# Altium PCB bspd.PcbDoc
Units mm, origin at the board's own origin, x right, y up, seen from the top; angles counter-clockwise.
Board outline 90 x 70 mm, 2 copper layers (F.Cu, B.Cu); 75 components, 35 nets, 192 pads, 148 vias.
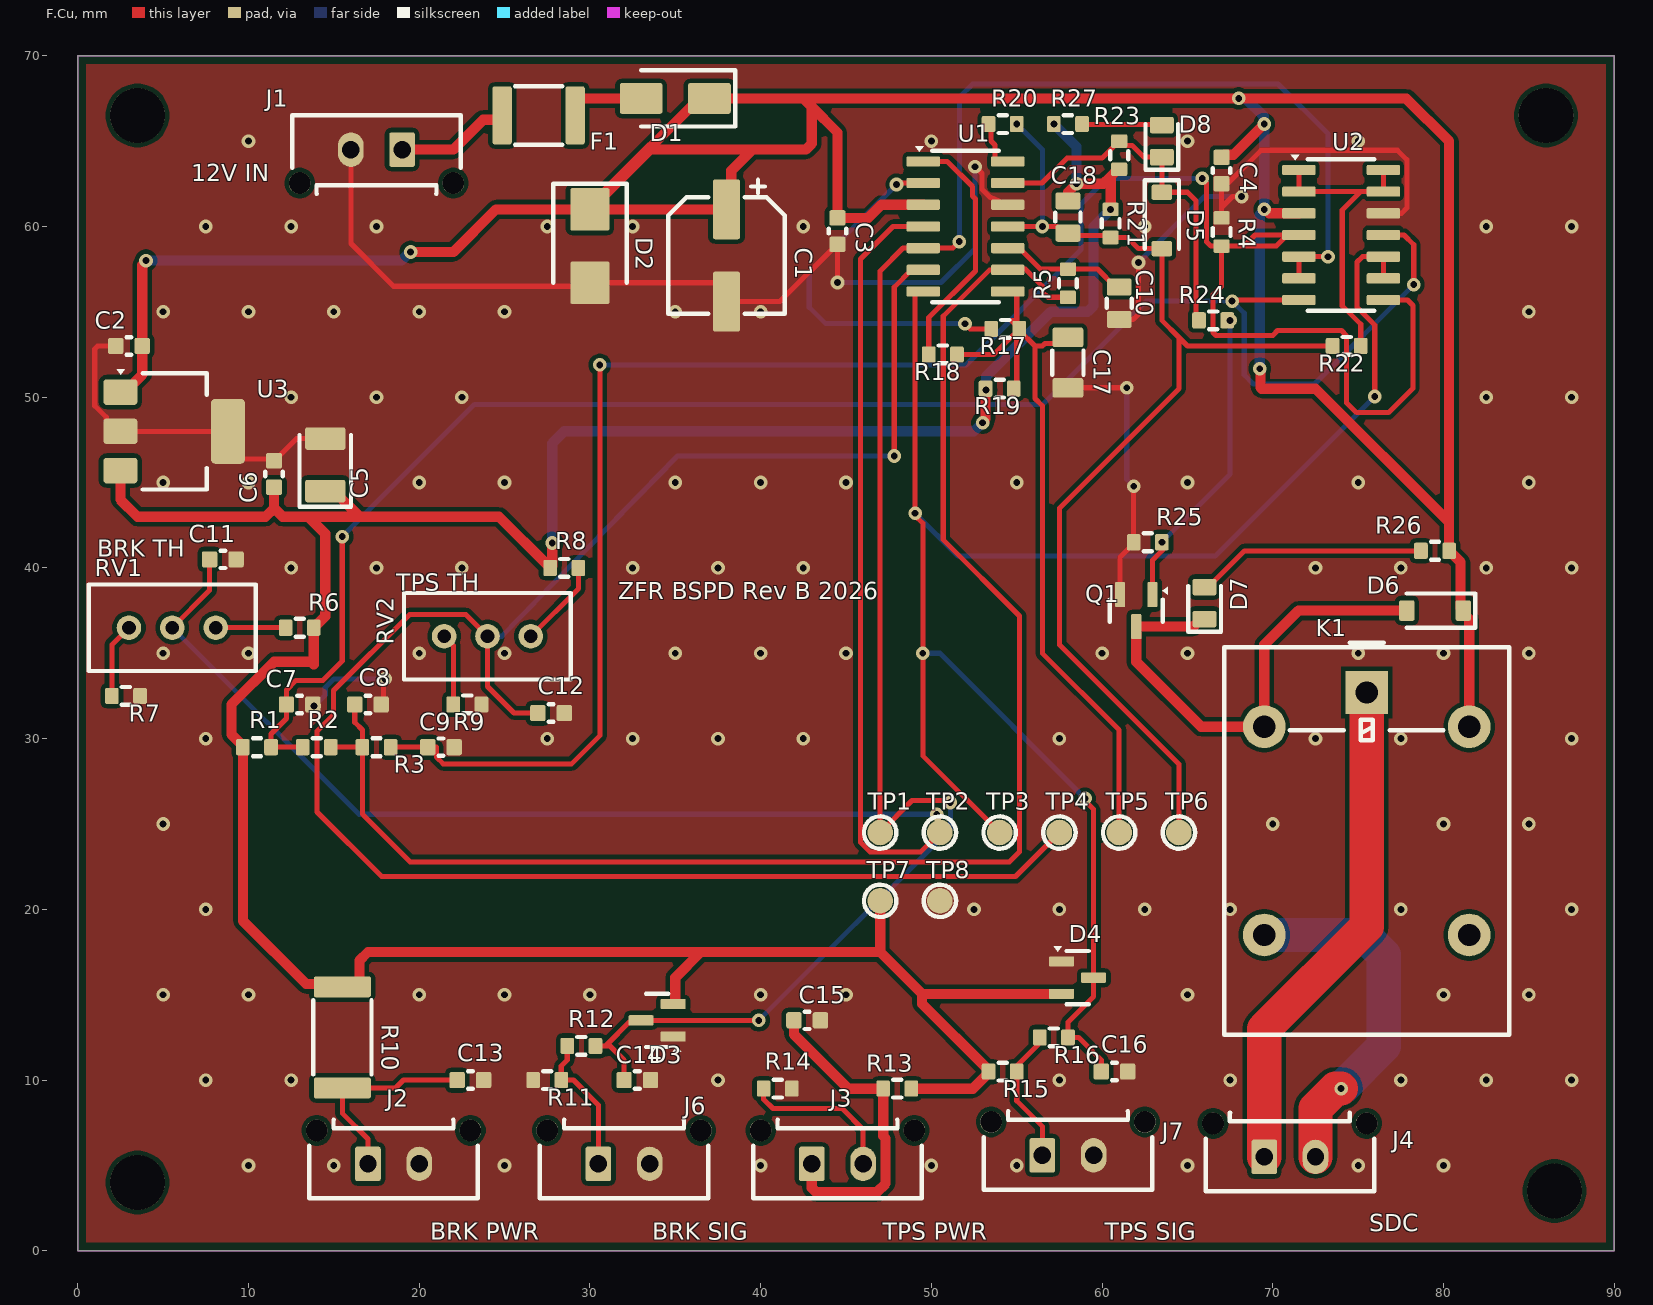
[diagram p0: F.Cu view]
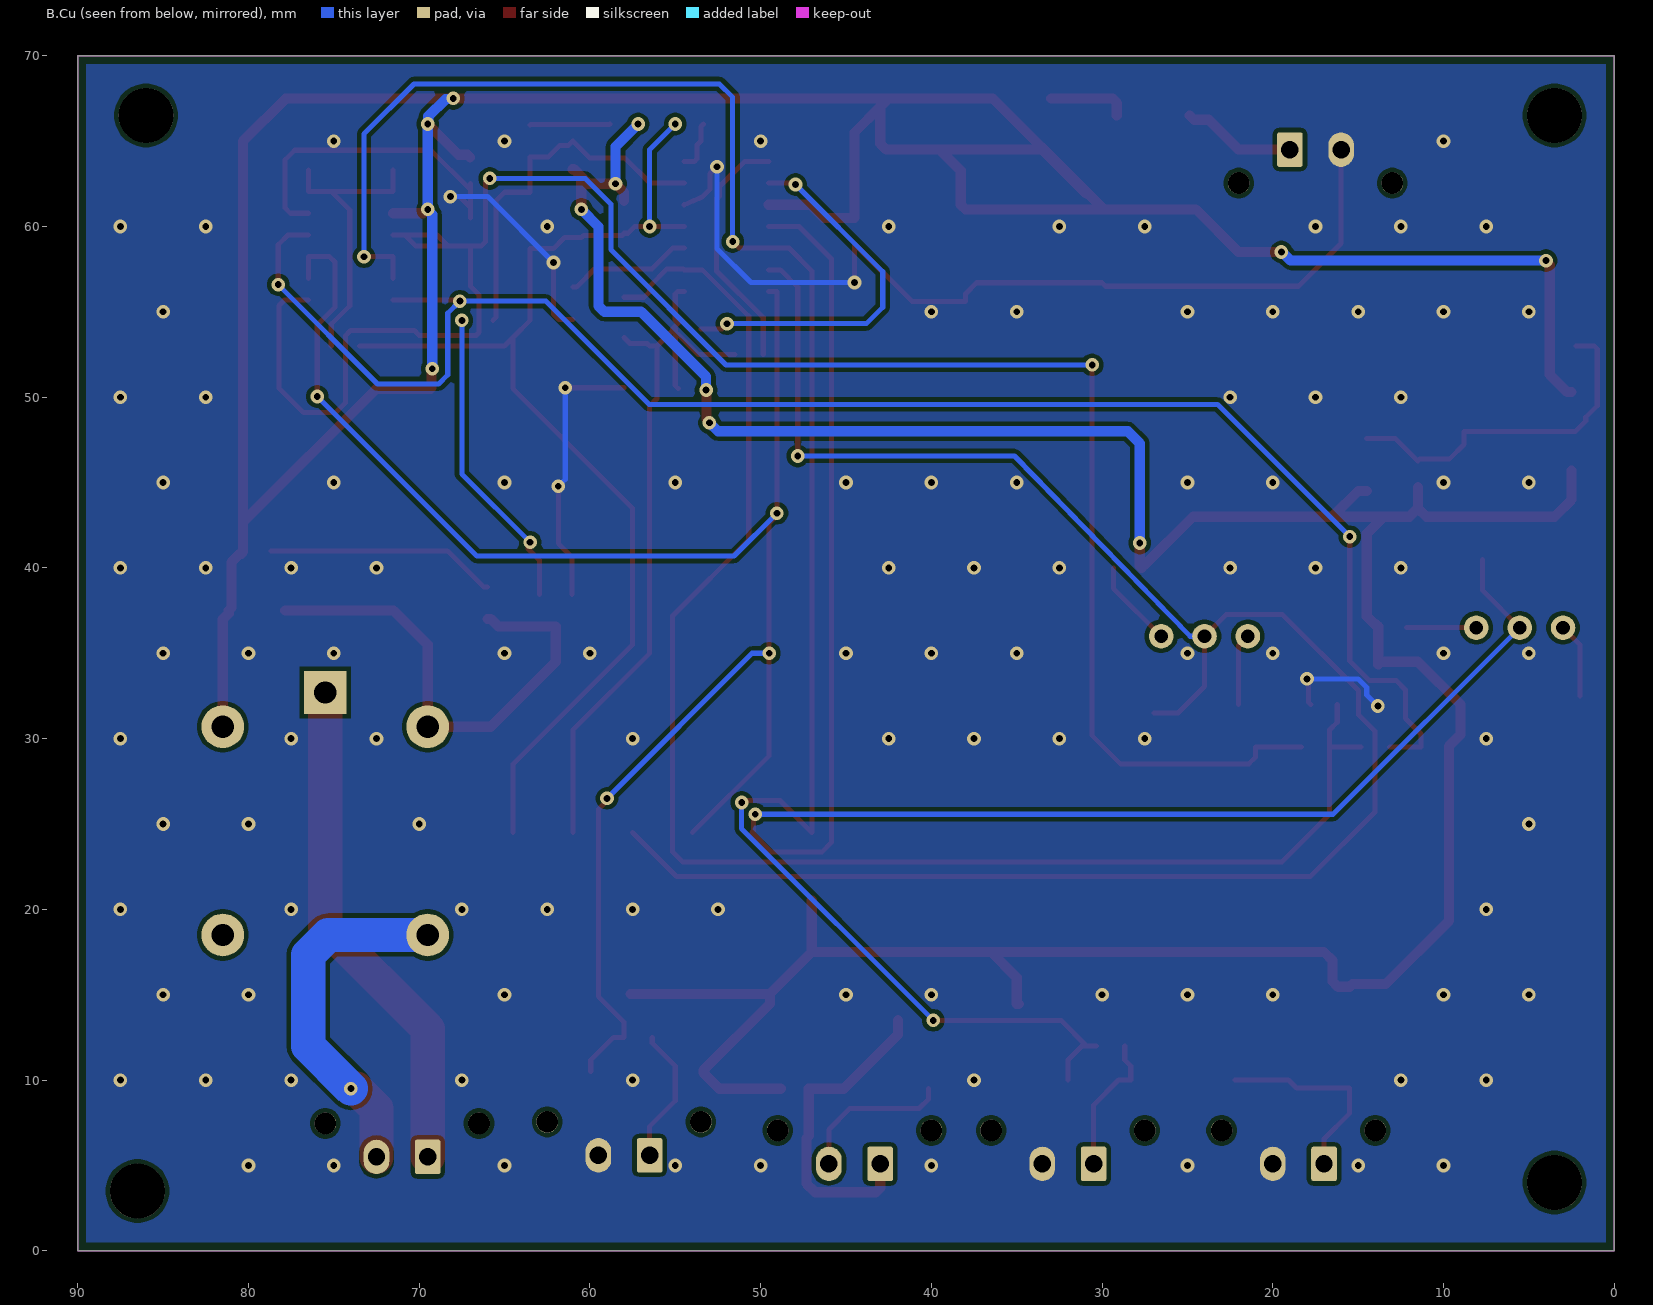
[diagram p1: B.Cu view, seen from below]

## Layer stack, top to bottom
F.Mask: solder mask 0.0102, Solder Resist, Dk 3.5
F.Cu: signal copper 0.0356
Dielectric 1: dielectric 0.32, FR-4, Dk 4.8
B.Cu: signal copper 0.0356
B.Mask: solder mask 0.0102, Solder Resist, Dk 3.5

## Board outline
90,0 90,70 0,70 0,0

## Design rules (kind name [scope] priority, off if disabled: settings)
BoardOutlineClearance [All] p1: gap=0.5 ignorepadtopadclearanceinfootprint=FALSE
Clearance "Clearence _all" [All] p1: gap=0.25 ignorepadtopadclearanceinfootprint=FALSE
HoleSize [All] p1: absolutevalues=TRUE maxlimit=3.5 minlimit=0.025 maxpercent=80.000 minpercent=20.000
MinimumSolderMaskSliver [All] p1: minsoldermaskwidth=0
PolygonConnect [All] p1: connectstyle=Direct reliefconductorwidth=0.254 reliefentries=4 polygonreliefangle="90 Angle" airgapwidth=0.254
RoutingVias [All] p1: holewidth=0.4 width=0.8 viastyle="Through Hole" minholewidth=0.3 minwidth=0.7 maxholewidth=0.6 maxwidth=1
SilkToSilkClearance [All] p1: silktosilkclearance=0
SilkToSolderMaskClearance [IsPad] p1: minsilkscreentomaskgap=0 clearancetoexposedcopper=TRUE
SolderMaskExpansion [All] p1: expansion=0 istentingtop=FALSE
SupplyNets "Schematic Supply Nets_2" [InNet('+5V')] p1: voltage=0.000
SupplyNets "Schematic Supply Nets_1" [InNet('GND')] p2: voltage=0.000
SupplyNets "Schematic Supply Nets" [InNet('+12V')] p3: voltage=0.000
Width Width_SDC [InNetClass('SDC')] p1: maxlimit=3 minlimit=1.5 preferedwidth=2
Width Width_PWR [InNetClass('New Class')] p2: maxlimit=1 minlimit=0.5 preferedwidth=0.6
Width [All] p3: maxlimit=3 minlimit=0.254 preferedwidth=0.3
26 further rules are at their usual default settings.

## Components (designator, comment, footprint, x,y, rotation, side; value= is the part's Value field where it differs from the comment)
C1 "47uF 35V" CP_Elec_6.3x7.7 38,58.3 r270 top
C2 "100nF 50V" C_0603_1608Metric 3,53 r180 top
C3 "100nF 50V" C_0603_1608Metric 44.5,59.725 r270 top
C4 "100nF 50V" C_0603_1608Metric 67,63.275 r270 top
C5 "22uF 16V Tant" CP_EIA-3528-21_Kemet-B 14.5,46.038 r90 top
C6 "100nF 50V" C_0603_1608Metric 11.5,45.5 r90 top
C7 "100nF 50V" C_0603_1608Metric 13,32 r0 top
C8 "100nF 50V" C_0603_1608Metric 17,32 r0 top
C9 "100nF 50V" C_0603_1608Metric 21.275,29.5 r0 top
C10 "1uF 25V" C_0805_2012Metric 61,55.5 r270 top
C11 "100nF 50V" C_0603_1608Metric 8.5,40.5 r0 top
C12 "100nF 50V" C_0603_1608Metric 27.725,31.5 r0 top
C13 "100nF 50V" C_0603_1608Metric 23,10 r0 top
C14 "100nF 50V" C_0603_1608Metric 32.775,10 r0 top
C15 "100nF 50V" C_0603_1608Metric 42.725,13.5 r0 top
C16 "10nF" C_0603_1608Metric 60.725,10.5 r0 top
C17 "1uF 50V X7R" C_1206_3216Metric 58,52.025 r270 top
C18 "1uF 25V" C_0805_2012Metric 58,60.55 r270 top
D1 "SS34" D_SMA 35,67.5 r180 top
D2 "SMBJ18A" D_SMB 30,58.85 r270 top
D3 "BAV199" SOT-23 33.938,13.5 r180 top
D4 "BAV199" SOT-23 58.563,16 r0 top
D5 "1N4148W" D_SOD-123 63.5,60.35 r270 top
D6 "1N4148W" D_SOD-123 79.5,37.5 r180 top
D7 "GREEN BSPD OK" LED_0805_2012Metric 66,37.937 r90 top
D8 "RED TRIPPED" LED_0805_2012Metric 63.5,65 r90 top
F1 "0.5A" Fuse_1812_4532Metric 27,66.5 r0 top
J1 "GLV_12V_IN" Molex_Micro-Fit_3.0_43650-0215_1x02_P3.00mm_Vertical 19,64.5 r180 top
J2 "BRK_SUPPLY" Molex_Micro-Fit_3.0_43650-0215_1x02_P3.00mm_Vertical 17,5.092 r0 top
J3 "TPS_SUPPLY" Molex_Micro-Fit_3.0_43650-0215_1x02_P3.00mm_Vertical 43,5.092 r0 top
J4 "SDC" Molex_Micro-Fit_3.0_43650-0215_1x02_P3.00mm_Vertical 69.5,5.5 r0 top
J6 "BRK_SIGNAL" Molex_Micro-Fit_3.0_43650-0215_1x02_P3.00mm_Vertical 30.5,5.092 r0 top
J7 "TPS_SIGNAL" Molex_Micro-Fit_3.0_43650-0215_1x02_P3.00mm_Vertical 56.5,5.592 r0 top
K1 "G5LE-1 DC12" Relay_SPDT_Omron-G5LE-1 75.5,32.7 r0 top
Q1 "AO3400A" SOT-23 62,37.5 r270 top
R1 "1k" R_0603_1608Metric 10.5,29.5 r0 top
R2 "9.1k" R_0603_1608Metric 14,29.5 r0 top
R3 "9.1k" R_0603_1608Metric 17.5,29.5 r0 top
R4 "1k" R_0603_1608Metric 67,59.675 r90 top
R5 "100k" R_0603_1608Metric 58,56.675 r90 top
R6 "62k" R_0603_1608Metric 13,36.5 r180 top
R7 "11k" R_0603_1608Metric 2.825,32.5 r0 top
R8 "15k" R_0603_1608Metric 28.5,40 r0 top
R9 "3.3k" R_0603_1608Metric 22.825,32 r0 top
R10 "0R" R_2512_6332Metric 15.5,12.5 r270 top
R11 "100k" R_0603_1608Metric 27.5,10 r180 top
R12 "10k" R_0603_1608Metric 29.5,12 r0 top
R13 "0R" R_0603_1608Metric 48,9.5 r180 top
R14 "0R" R_0603_1608Metric 41,9.5 r0 top value=JCJC
R15 "470k" R_0603_1608Metric 54.175,10.5 r0 top
R16 "10k" R_0603_1608Metric 57.175,12.5 r0 top
R17 "1k" R_0603_1608Metric 54.325,54 r0 top
R18 "1k" R_0603_1608Metric 50.675,52.5 r0 top
R19 "470k" R_0603_1608Metric 54,50.5 r0 top
R20 "1k" R_0603_1608Metric 54.175,66 r0 top
R21 "1M" R_0603_1608Metric 60.5,60.175 r270 top
R22 "100k" R_0603_1608Metric 74.325,53 r180 top
R23 "10k" R_0603_1608Metric 61,64.175 r90 top
R24 "100R" R_0603_1608Metric 66.5,54.5 r0 top
R25 "100k" R_0603_1608Metric 62.675,41.5 r180 top
R26 "2.2k" R_0603_1608Metric 79.5,41 r180 top
R27 "1k" R_0603_1608Metric 58,66 r0 top
RV1 "10k 25T" Potentiometer_Bourns_3296W_Vertical 8.08,36.5 r0 top
RV2 "10k 25T" Potentiometer_Bourns_3296W_Vertical 26.54,36 r0 top
TP1 "BRK" TestPoint_Pad_D1.5mm 47,24.5 r0 top
TP2 "BRK_TH" TestPoint_Pad_D1.5mm 50.5,24.5 r0 top
TP3 "TPS" TestPoint_Pad_D1.5mm 54,24.5 r0 top
TP4 "TPS_TH" TestPoint_Pad_D1.5mm 57.5,24.5 r0 top
TP5 "CT" TestPoint_Pad_D1.5mm 61,24.5 r0 top
TP6 "LATCH" TestPoint_Pad_D1.5mm 64.5,24.5 r0 top
TP7 "+5V" TestPoint_Pad_D1.5mm 47,20.5 r0 top
TP8 "GND" TestPoint_Pad_D1.5mm 50.5,20.5 r0 top
U1 "LM2901" SOIC-14_3.9x8.7mm_P1.27mm 52,60 r0 top
U2 "LM2901" SOIC-14_3.9x8.7mm_P1.27mm 74,59.5 r0 top
U3 "LM2940IMP-5.0" SOT-223-3_TabPin2 5.65,48 r0 top

## Footprints (in the part's own frame and the unit in brackets; to place one, negate y for a bottom-side part, rotate by r counter-clockwise, add the part's x,y. Pads: shape width x height; smd on the part's side, far side on the other; paste and mask are expansions set on the pad)
C_0603_1608Metric [mm]
  rrect25% 0.9x0.95 smd mask+0: 1(-0.775,0) 2(0.775,0)
  silkscreen extent -0.14,-0.51 0.14,0.51
C_0805_2012Metric [mm]
  rrect25% 1x1.45 smd mask+0: 1(-0.95,0) 2(0.95,0)
  silkscreen extent -0.26,-0.73 0.26,0.74
C_1206_3216Metric [mm]
  rrect22% 1.15x1.8 smd mask+0: 1(-1.475,0) 2(1.475,0)
  silkscreen extent -0.71,-0.91 0.71,0.91
CP_EIA-3528-21_Kemet-B [mm]
  rrect19% 1.325x2.35 smd mask+0: 1(-1.538,0) 2(1.538,0)
  silkscreen extent -2.46,-1.51 1.75,1.51
CP_Elec_6.3x7.7 [mm]
  rrect16% 3.5x1.6 smd mask+0: 1(-2.7,0) 2(2.7,0)
  silkscreen extent -4.44,-3.41 3.41,3.41
D_SMA [mm]
  rrect14% 2.5x1.8 smd mask+0: 1(-2,0) 2(2,0)
  silkscreen extent -3.51,-1.65 2,1.65
D_SMB [mm]
  rrect11% 2.5x2.3 smd mask+0: 1(-2.15,0) 2(2.15,0)
  silkscreen extent -3.66,-2.15 2.15,2.15
D_SOD-123 [mm]
  rrect25% 0.9x1.2 smd mask+0: 1(-1.65,0) 2(1.65,0)
  silkscreen extent -2.36,-1 1.65,1
Fuse_1812_4532Metric [mm]
  rrect22% 1.125x3.4 smd mask+0: 1(-2.138,0) 2(2.138,0)
  silkscreen extent -1.39,-1.71 1.39,1.71
LED_0805_2012Metric [mm]
  rrect25% 0.975x1.4 smd mask+0: 1(-0.938,0) 2(0.938,0)
  silkscreen extent -1.68,-0.96 1,0.96
Molex_Micro-Fit_3.0_43650-0215_1x02_P3.00mm_Vertical [mm]
  rrect17% 1.5x2.02 hole 1.02 paste-2539.97 mask+0: 1(0,0)
  rrect100% 1.5x2.02 hole 1.02 paste-2539.97 mask+0: 2(3,0)
  round 1.27 hole 1.27 unplated paste-2539.97 mask+0: Un1(-3,1.96) Un2(6,1.96)
  silkscreen extent -3.44,-2.01 6.44,2.58
Potentiometer_Bourns_3296W_Vertical [mm]
  round 1.44 hole 0.8 paste-2539.97 mask+0: 1(0,0) 2(-2.54,0) 3(-5.08,0)
  silkscreen extent -7.42,-2.54 2.34,2.53
R_0603_1608Metric [mm]
  rrect25% 0.8x0.95 smd mask+0: 1(-0.825,0) 2(0.825,0)
  silkscreen extent -0.24,-0.52 0.24,0.52
R_2512_6332Metric [mm]
  rrect20% 1.225x3.35 smd mask+0: 1(-2.963,0) 2(2.963,0)
  silkscreen extent -2.18,-1.71 2.18,1.71
Relay_SPDT_Omron-G5LE-1 [mm]
  rect 2.5x2.5 hole 1.3 paste-2539.97 mask+0: 1(0,0)
  rrect100% 2.5x2.5 hole 1.3 paste-2539.97 mask+0: 2(-6,-2) 3(-6,-14.2) 4(6,-14.2) 5(6,-2)
  silkscreen extent -8.35,-20.05 8.35,2.91
SOIC-14_3.9x8.7mm_P1.27mm [mm]
  rrect25% 1.95x0.6 smd mask+0: 1(-2.475,3.81) 2(-2.475,2.54) 3(-2.475,1.27) 4(-2.475,0) 5(-2.475,-1.27) 6(-2.475,-2.54) 7(-2.475,-3.81) 8(2.475,-3.81) 9(2.475,-2.54) 10(2.475,-1.27) 11(2.475,0) 12(2.475,1.27) 13(2.475,2.54) 14(2.475,3.81)
  silkscreen extent -2.94,-4.44 1.95,4.7
SOT-23 [mm]
  rrect25% 1.475x0.6 smd mask+0: 1(-0.938,0.95) 2(-0.938,-0.95) 3(0.938,0)
  silkscreen extent -1.4,-1.56 0.65,1.84
SOT-223-3_TabPin2 [mm]
  rrect25% 2x1.5 smd mask+0: 1(-3.15,2.3) 2(-3.15,0) 3(-3.15,-2.3)
  rrect25% 2x3.8 smd mask+0: 2(3.15,0)
  silkscreen extent -3.37,-3.41 1.91,3.64
TestPoint_Pad_D1.5mm [mm]
  round 1.5 smd paste-1.5 mask+0: 1(0,0)
  silkscreen extent -0.95,-0.95 0.95,0.95

## Part data
C1: library part C_Polarized, MPN="Panasonic EEE-FK1V470P", Alt1="Nichicon UWT1V470MCL1GS", Note="Bulk, aluminium electrolytic"
C2 C3 C4 C6 C7 C8 C9 C11 C12 C13 C14 C15: library part C, MPN="Samsung CL10B104KB8NNNC", Alt1="Murata GRM188R71H104KA93D"
  C3: Note="U1 decoupling (place at pin 3)"
  C4: Note="U2 decoupling (place at pin 3)"
C5: library part C_Polarized, MPN="KEMET T491B226K016AT", Alt1="AVX TAJB226K016RNJ", Note="LDO output cap: tantalum (ESR 0.1-1 ohm needed for LM2940 stability, NOT ceramic)"
C10 C18: library part C, MPN="Samsung CL21B105KAFNNNE", Alt1="Murata GRM21BR71E105KA99L"
  C18: Note="To +5V (not GND): latch powers up in OK state"
C16: library part C, MPN="Samsung CL10B103KB8NNNC", Alt1="Murata GRM188R71H103KA01D", Note="10 nF (not 100 nF) so open-wiper fault trips < 100 ms"
C17: library part C, MPN="Murata GRM31MR71H105KA88L", Alt1="Samsung CL31B105KBHNNNE", Alt2="TDK C3216X7R1H105K160AB", Note="Timing cap (50 V X7R 1206 for low DC-bias loss)"
D1: library part D_Schottky, MPN="SS34 (onsemi/MCC)", Alt1=B340A-13-F, Alt2=SS36, Note="Reverse-polarity protection, 3 A 40 V"
D2: library part D_Zener, MPN="Littelfuse SMBJ18A", Alt1="Vishay SMBJ18A-E3/52", Alt2="Littelfuse P6SMB22A", Note="Unidirectional TVS 18 V stand-off (load-dump clamp)"
D3 D4: library part BAT54S, MPN="Nexperia BAT54S,215", Alt1="onsemi BAT54SLT1G", Alt2="Diodes BAT54S-7-F", Note="Input clamp"
D5 D6: library part D, MPN="Diodes Inc 1N4148W-7-F", Alt1="onsemi MMSD4148T1G", Alt2="Nexperia 1N4148W,115"
  D5: Note="Latch hold diode"
  D6: Note="Coil flyback"
D7: library part LED, MPN="Kingbright APT2012SGC", Alt1="Lite-On LTST-C171GKT", Note="On = relay closed"
D8: library part LED, MPN="Kingbright APT2012SURCK", Alt1="Lite-On LTST-C171KRKT", Note="On = latched trip"
F1: library part Polyfuse, MPN="Bourns MF-MSMF050-2", Alt1="Littelfuse 1812L050PR", Note="Resettable fuse 0.5 A hold"
J1 J2 J3 J4 J6 J7: library part Conn_01x02, MPN="Molex 43650-0215", Alt1="Molex 43650-0221"
  J1: Alt2="Any Micro-Fit 3.0 compatible vertical 2-pin", Note="GLV 12 V in (after GLVMS, NOT via SDC)"
  J2: Note="MLH02KPSB06A supply: 1=+5V 2=GND"
  J3: Note="Throttle-body sensor 3382H-1-103 track: 1=CW end 2=CCW end"
  J4: Note="In series with shutdown circuit"
  J6: Note="MLH02KPSB06A output (separately disconnectable, T 11.6.7): 1=signal 2=shield"
  J7: Note="3382H wiper (separately disconnectable, T 11.6.7): 1=wiper 2=shield"
K1: library part G5LE-1, MPN="Omron G5LE-1 DC12", Alt1="Omron G5LE-14 DC12 (sealed)", Alt2="Omron G5LE-1-E DC12", Note="SDC relay; uses COM(1)+NO(3) - closed only when healthy"
Q1: library part Q_NMOS_GSD, MPN="AOS AO3400A", Alt1="Vishay Si2302CDS", Alt2="Infineon IRLML6344", Note="Relay driver"
R1 R4 R13 R14 R17 R18 R20 R27: library part R, MPN="Yageo RC0603FR-071KL", Alt1="UNI-ROYAL 0603WAF1001T5E", Alt2="Panasonic ERJ-3EKF1001V"
  R1: Note="Ref ladder (1 %)"
  R13: Note="Pot top series (current limit + rail margin)"
  R14: Note="Pot bottom series"
  R17 R18: Note="CT discharge"
R2 R3: library part R, MPN="Yageo RC0603FR-079K1L", Alt1="UNI-ROYAL 0603WAF9101T5E", Alt2="Panasonic ERJ-3EKF9101V"
R5 R11 R22 R25: library part R, MPN="Yageo RC0603FR-07100KL", Alt1="UNI-ROYAL 0603WAF1003T5E", Alt2="Panasonic ERJ-3EKF1003V"
  R5: Note="Latch-reference lag (power-up immunity)"
  R11: Note="Pull-down: open wire -> 0 V -> fault"
  R22: Note="Fault filter ~70 ms"
R6: library part R, MPN="Yageo RC0603FR-0762KL", Alt1="UNI-ROYAL 0603WAF6202T5E", Alt2="Panasonic ERJ-3EKF6202V", Note="Limits RV1 max to 1.27 V = 26.4 bar nom., 28.4 bar worst case (T 11.6.5 <=30 bar)"
R7: library part R, MPN="Yageo RC0603FR-0711KL", Alt1="UNI-ROYAL 0603WAF1102T5E", Alt2="Panasonic ERJ-3EKF1102V"
R8: library part R, MPN="Yageo RC0603FR-0715KL", Alt1="UNI-ROYAL 0603WAF1502T5E", Alt2="Panasonic ERJ-3EKF1502V"
R9: library part R, MPN="Yageo RC0603FR-073K3L", Alt1="UNI-ROYAL 0603WAF3301T5E", Alt2="Panasonic ERJ-3EKF3301V"
R10: library part R, MPN="Yageo RC2512FK-0747RL", Alt1="Vishay CRCW251247R0FKEG", Note="Sensor-supply short protection"
R12 R16 R23: library part R, MPN="Yageo RC0603FR-0710KL", Alt1="UNI-ROYAL 0603WAF1002T5E", Alt2="Panasonic ERJ-3EKF1002V"
R15 R19: library part R, MPN="Yageo RC0603FR-07470KL", Alt1="UNI-ROYAL 0603WAF4703T5E", Alt2="Panasonic ERJ-3EKF4703V"
  R15: Note="Pull-UP: open wiper/GND -> 5 V -> fault"
  R19: Note="Timer: 0.693*R19*C17 = 326 ms"
R21: library part R, MPN="Yageo RC0603FR-071ML", Alt1="UNI-ROYAL 0603WAF1004T5E", Alt2="Panasonic ERJ-3EKF1004V"
R24: library part R, MPN="Yageo RC0603FR-07100RL", Alt1="UNI-ROYAL 0603WAF1000T5E", Alt2="Panasonic ERJ-3EKF1000V"
R26: library part R, MPN="Yageo RC0603FR-072K2L", Alt1="UNI-ROYAL 0603WAF2201T5E", Alt2="Panasonic ERJ-3EKF2201V"
RV1 RV2: library part R_Potentiometer_Trim, MPN="Bourns 3296W-1-103LF", Alt1="Vishay T93YA103KT20", Alt2="Suntan TSR-3296W-103"
  RV1: Note="Hard-brake threshold trim 0.66-1.27 V = 5.6-26.4 bar"
  RV2: Note="Throttle-body 20 % threshold trim 0.58-2.35 V"
TP1 TP2 TP3 TP4 TP5 TP6 TP7 TP8: library part TestPoint, MPN="PCB pad only (no part)", Note="Test pad (no header: T 11.6.4 minimal interfaces)"
U1 U2: MPN="TI LM2901DR", Alt1="onsemi LM2901DR2G", Alt2="TI LM339ADR"
  U1: Note="Hard brake detect"
  U2: Note="Brake < 0.25 V"
U3: library part SPX2920M3-5.0_SOT223, MPN="TI LM2940IMP-5.0/NOPB", Alt1="TI LM2937IMP-5.0/NOPB", Note="5 V automotive LDO (reverse-battery & load-dump rated)"

## Free pads (board coordinates)
  round 3.2 hole 3.2 unplated: MH1(3.5,4) MH2(86.5,3.5) MH3(86,66.5) MH4(3.5,66.5)

## Via types
v1: diameter 0.8, hole 0.4, F.Cu to B.Cu, 148 vias

## Nets (pads, with @x,y where several pads share a name; then routed paths per layer and width w, separated by ;. In a path a pad name is that pad's centre, name@x,y a point inside that pad or via, vN(x,y) a via of type N, cw(c..) or ccw(c..) an arc to the next point about the centre after c; other vN are vias at no path point)
+5V: C5.1 C6.1 C18.1 D3.2 D4.2 R1.1 R6.1 R8.1 R10.1 R13.1 R15.1 R19.1 R21.1 R23.1 R27.1 TP7.1 U3.3 | length 191.7
  F.Cu w0.6: U3.3 2.5,44 3.5,43 11,43 11.5,43.5 ; C6.1 11.5,43.5 ; 14,43 13.5,43 ; C5.1 15.013,44.5 16.512,43 ; v1(27.791,41.461) 27.791,40.116 R8.1 27.675,40.075 27.575,40.175 27.5,40.175 24.675,43 16.512,43 ; D3.2 35,14.45 35,16 36.5,17.5 ; TP7.1 47,17.5 ; R13.1 52.425,9.5 53.35,10.425 R15.1 53.35,10.575 49.45,14.475 49.45,15.05 ; v1(53,48.5) 53,48.554 53.175,48.729 R19.1 ; D4.2 49.45,15.05 ; C18.1 58,62 v1(58.5,62.5) 60.075,62.5 60.5,62.925 ; v1(60.5,61) 60.5,62.925 ; R23.1 60.925,63.35 60.5,62.925 ; 11.5,43.5 12,43 13.5,43 ; 13.5,43 14.149,43 16.512,43 ; 13.5,43 14.5,42 14.5,37.175 14,36.675 13.925,36.675 13.825,36.575 13.825,34.351 13.676,34.5 11.5,34.5 9,32 9,30.25 9.675,29.575 R1.1 9.675,19.325 13.374,15.626 15.337,15.626 R10.1 16.188,15.463 16.5,15.775 16.5,17 17,17.5 36.5,17.5 ; 36.5,17.5 47,17.5 ; 47,17.5 49.45,15.05
  B.Cu w0.6: v1(27.791,41.461) 27.791,47.291 28.5,48 52.5,48 v1(53,48.5) ; v1(53.195,50.422) 53.195,51.195 57,55 59.149,55 59.5,55.351 59.5,60 v1(60.5,61) ; v1(57.175,66) 58.5,64.675 v1(58.5,62.5)
+12V: C1.1 C2.1 C3.1 C4.1 D1.1 D2.1 D6.1 K1.5 R26.1 U1.3 U2.3 U3.1 | length 234
  F.Cu w0.6: U3.1 2.75,50.3 3.775,51.325 C2.1 3.775,57.721 4,57.946 v1(4,58) ; v1(19.5,58.5) 22,58.5 24.5,61 D2.1 C1.1 38.274,61.274 38.274,63.274 39.5,64.5 ; D2.1@30,61.1 D2.1@30.85,61.95 ; D1.1 42.5,67.5 ; U1.3 47.073,61.27 46.303,60.5 C3.1 44.5,65.5 43,67 ; C4.1@67.025,64.05 67.175,64.2 67.7,64.2 v1(69.5,66) ; v1(68,67.5) 42.5,67.5 ; v1(69.235,51.668) 69.273,51.63 69.273,50.578 69.351,50.5 72.5,50.5 80.325,42.675 ; v1(69.5,61) 69.554,61 69.784,60.77 U2.3 ; K1.5 81.5,37 81.15,37.35 D6.1 81,37.65 81,40.325 80.5,40.825 80.425,40.825 80.325,40.925 R26.1 80.325,42.675 ; D2.1@30.85,61.95 36.388,67.488 77.825,67.488 80.325,64.988 80.325,42.675 ; D2.1@30.85,61.95 30.95,61.95 33.5,64.5 38.389,64.5 38.449,64.5 39.5,64.5 ; 39.5,64.5 42.649,64.5 43,64.851 43,67 ; 42.5,67.5 43,67
  B.Cu w0.6: v1(4,58) 18.946,58 19.446,58.5 v1(19.5,58.5) ; v1(68,67.5) 68.038,67.462 68.454,67.462 69.462,66.454 69.462,66.038 v1(69.5,66) v1(69.5,61) 69.5,60.946 69.235,60.681 v1(69.235,51.668)
BRK: C14.1 D3.3 R12.2 TP1.1 U1.5 U2.5 U2.6 | length 115.1
  F.Cu w0.3: R12.2 30.912,12 ; C14.1 32,11.176 31.176,12 30.912,12 ; v1(39.89,13.5) D3.3 32.412,13.5 30.912,12 ; v1(51.105,26.264) 50.969,26.264 50.864,26.369 48.869,26.369 TP1.1 47,57.394 48.336,58.73 U1.5 51.257,58.73 v1(51.638,59.111) ; U2.6 U2.5 v1(73.233,58.23)
  B.Cu w0.3: v1(39.89,13.5) 51.117,24.727 51.117,26.251 v1(51.105,26.264) ; v1(51.638,59.111) 51.638,67.564 52.425,68.351 70.307,68.351 73.233,65.426 v1(73.233,58.23)
BRK_5V: C13.1 J2.1 R10.2 | length 12
  F.Cu w0.3: J2.1 17,6.553 15.5,8.053 R10.2 18.618,9.537 19.08,10 C13.1
BRK_SIG_IN: J6.1 R11.1 R12.1 | length 8.4
  F.Cu w0.3: R12.1 28.675,11.17 28.325,10.82 R11.1 29.032,10 30.5,8.532 J6.1
BRK_TH: C11.1 RV1.2 TP2.1 U1.4 | length 99.4
  F.Cu w0.3: RV1.2 7.725,38.685 C11.1 ; U1.4 47.757,60 45.847,58.09 45.847,23.927 46.424,23.35 49.35,23.35 TP2.1 50.409,24.591 50.409,25.478 v1(50.317,25.569)
  B.Cu w0.3: RV1.2 16.471,25.569 v1(50.317,25.569)
COIL_N: D6.2 D7.1 K1.2 Q1.3 | length 29.3
  F.Cu w0.6: D7.1 65.787,37 65.35,36.562 Q1.3 62,34.5 65.8,30.7 K1.2 69.5,35.5 71.5,37.5 D6.2
CT: C17.1 R17.2 R18.2 R19.2 TP5.1 U1.8 | length 44.9
  F.Cu w0.3: R18.2 53.65,52.5 54.825,53.675 54.9,53.675 R17.2@55,53.775 ; U1.8 54.85,56.19 55,56.04 55,54.5 54.696,54.5 54.686,54.49 55.15,54.026 R17.2 ; R19.2 55,50.675 55,53.85 55,54 R17.2 ; C17.1 57.65,53.15 56.65,53.15 56.5,53 56.075,53 ; TP5.1 61,30.5 56.5,35 56.5,49.5 56.075,49.925 56.075,53 ; R17.2 55.15,53.925 56.075,53
FAULT_N: R22.1 U2.1 U2.2 U2.13 U2.14 | length 17.4
  F.Cu w0.3: U2.1 U2.2 75.146,62.04 ; R22.1 75.15,54.272 74.066,55.356 74.066,60.96 75.146,62.04 ; U2.14 U2.13 75.146,62.04
GATE: Q1.1 R24.2 R25.1 | length 18.2
  F.Cu w0.3: Q1.1 62.95,40.45 63.626,41.126 63.626,41.374 v1(63.5,41.5) ; R24.2 v1(67.5,54.5)
  B.Cu w0.3: v1(63.5,41.5) 67.5,45.5 v1(67.5,54.5)
GND: C1.2 C2.2 C3.2 C4.2 C5.2 C6.2 C7.2 C8.2 C9.2 C10.2 C11.2 C12.2 C13.2 C14.2 C15.2 C16.2 C17.2 D2.2 D3.1 D4.1 J1.2 J2.2 J6.2 J7.2 Q1.2 R4.2 R7.2 R9.2 R11.2 R14.2 R25.2 TP8.1 U1.12 U2.12 U3.2 | length 132.2
  F.Cu w0.3: C2.2 1.176,53 1,52.824 1,49.5 1.673,48.827 1.673,48.597 2.27,48 2.5,48 8.8,48 8.8,47.23 9.642,46.388 11.387,46.388 C6.2 11.525,46.275 12.825,47.575 C5.2 ; C7.2 13.848,31.927 v1(13.848,31.907) ; J1.2 16,59 18.5,56.5 29.8,56.5 D2.2 37.35,56.7 38,56.05 C1.2 41.125,55.6 44.475,58.95 C3.2 v1(44.5,56.718) ; C8.2 17.904,32.129 17.904,33.404 v1(18,33.5) ; v1(52.552,63.5) 52.959,63.094 52.959,62.179 53.416,61.722 U1.12 ; C17.2 v1(61.442,50.55) ; C10.2 61.814,54.55 62.128,54.864 v1(62.128,57.887) ; Q1.2 61.05,40.625 61.85,41.425 R25.2 v1(61.85,44.779) ; C4.2@67,62.149 69.316,64.465 77.292,64.465 77.851,63.906 77.851,61.075 77.546,60.77 U2.12 ; C4.2 R4.2 67,61.107 67.64,61.747 v1(68.173,61.747)
  B.Cu w0.3: v1(13.848,31.907) 14.5,32.559 14.5,33 15,33.5 v1(18,33.5) ; v1(44.5,56.718) 50.571,56.718 52.552,58.699 v1(52.552,63.5) ; v1(61.442,50.55) 61.442,45.187 v1(61.85,44.779) ; v1(62.128,57.887) 65.989,61.747 v1(68.173,61.747)
  other v1: 10,5 15,5 25,5 40,5 50,5 55,5 65,5 75,5 80,5 7.5,10 12.5,10 37.5,10 57.5,10 67.5,10 77.5,10 82.5,10 87.5,10 5,15 10,15 20,15 25,15 30,15 40,15 45,15 65,15 80,15 85,15 7.5,20 52.5,20 57.5,20 62.5,20 67.5,20 77.5,20 87.5,20 5,25 70,25 80,25 85,25 7.5,30 27.5,30 32.5,30 37.5,30 42.5,30 57.5,30 72.5,30 77.5,30 87.5,30 5,35 10,35 20,35 25,35 35,35 40,35 45,35 60,35 65,35 75,35 80,35 85,35 12.5,40 17.5,40 22.5,40 32.5,40 37.5,40 42.5,40 72.5,40 77.5,40 82.5,40 87.5,40 5,45 10,45 20,45 25,45 35,45 40,45 45,45 55,45 65,45 75,45 85,45 12.5,50 17.5,50 22.5,50 82.5,50 87.5,50 5,55 10,55 15,55 20,55 25,55 35,55 40,55 85,55 7.5,60 12.5,60 17.5,60 27.5,60 32.5,60 42.5,60 62.5,60 82.5,60 87.5,60 10,65 50,65 65,65 75,65
LATCH: C18.2 D5.2 R20.2 R21.2 R22.2 TP6.1 U1.11 | length 65.8
  F.Cu w0.3: U1.11 57.375,60 57.775,59.6 C18.2 58.125,59.475 60.375,59.475 R21.2 61.488,59.35 62.137,58.7 D5.2 63.5,54.5 64.5,53.5 ; TP6.1 64.5,28.5 57.5,35.5 57.5,43.5 64.5,50.5 64.5,53.5 ; R22.2 65,53 64.5,53.5
  B.Cu w0.3: v1(55,66) 56.5,64.5 v1(56.5,60)
LED_G: D7.2 R26.2 | length 13.6
  F.Cu w0.3: D7.2 66.213,38.875 68.337,41 R26.2
LED_R: D8.2 R27.2 | length 4.7
  F.Cu w0.3: R27.2 58.856,65.969 63.469,65.969 D8.2
OK: D5.1 D8.1 R23.2 R24.1 U1.13 | length 21.8
  F.Cu w0.3: U1.13 56.485,62.54 57.945,64 60,64 R23.2 61.25,64.75 61.75,64.75 62.438,64.063 D8.1 D5.1 65,62 65.5,61.5 65.5,54.675 R24.1
RV1_B: R7.1 RV1.3 | length 4.4
  F.Cu w0.3: R7.1 2,35.5 RV1.3
RV1_T: R6.2 RV1.1 | length 4.1
  F.Cu w0.3: RV1.1 R6.2
RV2_B: R9.1 RV2.3 | length 4.2
  F.Cu w0.3: RV2.3 22,35.46 R9.1
RV2_T: R8.2 RV2.1 | length 5.2
  F.Cu w0.3: RV2.1 29.325,38.785 R8.2
SDC_A: J4.1 K1.1 | length 29.7
  F.Cu w2: J4.1 69.5,13 75.5,19 K1.1
SDC_B: J4.2 K1.3 | length 21.2
  F.Cu w2: J4.2 72.5,8.328 73.672,9.5 v1(74,9.5)
  B.Cu w2: K1.3 75.328,18.5 76.5,17.328 76.5,12 v1(74,9.5)
TMR_N: R20.1 U1.14 | length 3
  F.Cu w0.3: R20.1 53.5,65.85 53.5,65 53.725,64.775 53.725,63.96 53.875,63.81 U1.14
TPS: C16.1 D4.3 R16.2 TP3.1 U1.7 U2.9 U2.10 | length 108.3
  F.Cu w0.3: U1.7 49.047,56.19 49.047,43.07 49.5,42.617 49.5,29 TP3.1 ; v1(59,26.5) 59,26.365 59.5,25.865 D4.3 59.5,14.886 58,13.386 R16.2 58.626,12.5 59.95,11.176 C16.1 ; v1(75.971,50.038) 75.971,54.229 74.93,55.27 74.93,57.912 75.248,58.23 U2.10 U2.9
  B.Cu w0.3: v1(49.047,43.205) 51.562,40.691 66.624,40.691 v1(75.971,50.038) ; v1(49.5,35) 50.5,35 v1(59,26.5)
TPS_5V: C15.1 J3.1 R13.2 | length 19
  F.Cu w0.6: C15.1 41.95,12.685 45.135,9.5 R13.2 47.175,6.724 47.32,6.579 47.32,3.937 46.812,3.429 43.256,3.429 43,3.685 J3.1
TPS_RTN: J3.2 R14.1 | length 9.2
  F.Cu w0.3: R14.1 40.175,8.872 40.716,8.331 44.781,8.331 46,7.112 J3.2
TPS_SIG_IN: J7.1 R15.2 R16.1 | length 8.1
  F.Cu w0.3: R16.1 56.35,12.17 55,10.82 R15.2 55,8.79 56.5,7.29 J7.1
TPS_TH: C12.1 RV2.2 TP4.1 U1.6 | length 111.8
  F.Cu w0.3: C12.1 25.552,31.5 24,33.052 RV2.2 22.738,37.262 19.431,37.262 14.986,32.817 14.986,31.394 14.021,30.429 14.021,25.705 17.805,21.92 54.92,21.92 TP4.1 ; v1(47.828,46.558) 47.828,56.444 48.844,57.46 U1.6
  B.Cu w0.3: RV2.2 24.841,36 35.128,46.558 v1(47.828,46.558)
U1A_OUT: R17.1 U1.2 | length 22.1
  F.Cu w0.3: v1(47.955,62.459) 48.036,62.54 U1.2 ; v1(51.968,54.305) 52.273,54 R17.1
  B.Cu w0.3: v1(47.955,62.459) 42.85,57.353 42.85,55.27 43.815,54.305 v1(51.968,54.305)
U1B_OUT: R18.1 U1.1 | length 14.5
  F.Cu w0.3: U1.1 50.927,63.81 52.403,62.334 52.403,61.777 52.578,61.602 52.578,57.394 49.85,54.667 R18.1
VIN_F: D1.2 F1.2 | length 4.7
  F.Cu w0.6: F1.2 29.138,67.238 29.4,67.5 D1.2
VIN_RAW: F1.1 J1.1 | length 6.7
  F.Cu w0.6: J1.1 22,64.5 23.751,66.251 24.614,66.251 F1.1
VREF_0V25: C9.1 R3.2 R4.1 U2.4 U2.8 | length 117.9
  F.Cu w0.3: R3.2 C9.1 21.006,29.5 21.006,28.931 21.412,28.524 28.93,28.524 30.581,30.175 v1(30.581,51.892) ; v1(65.862,62.814) 66.116,62.56 66.116,59.104 66.37,58.85 R4.1 ; U2.4 U2.4@70.85,59.5 ; U2.8 77.888,55.69 78.206,55.372 78.206,50.521 76.784,49.098 74.892,49.098 74.32,49.67 74.32,53.594 74.015,53.899 70.282,53.899 70.002,53.619 66.676,53.619 66.5,53.795 66.5,56 67,56.5 R4.1 ; R4.1 67.283,58.85 68.3,58.85 ; 68.3,58.85 68.95,59.5 U2.4@70.85,59.5 ; 68.3,58.85 69.787,58.85 70.2,58.85 U2.4@70.85,59.5
  B.Cu w0.3: v1(30.581,51.892) 52.022,51.892 58.775,58.645 58.775,61.316 60.274,62.814 v1(65.862,62.814)
VREF_2V5: C8.1 R2.2 R3.1 R5.1 U1.9 | length 90.9
  F.Cu w0.3: R2.2 R3.1 ; C8.1 16.225,30.955 16.675,30.505 R3.1 ; R5.1 56.826,55.85 56.5,56.176 56.5,56.5 55.5,57.5 54.515,57.5 U1.9 53.421,57.46 50.698,54.737 50.698,41.656 55.169,37.186 55.169,23.368 54.584,22.784 19.469,22.784 16.675,25.578 R3.1
VREF_4V75: C7.1 R1.2 R2.1 U2.7 U2.11 | length 100.1
  F.Cu w0.3: R2.1 R1.2 11.325,30.277 12.225,31.177 C7.1 12.225,32.85 12.776,33.401 14.351,33.401 15.494,34.544 v1(15.494,41.834) ; v1(67.615,55.626) 67.679,55.69 U2.7 ; U2.11 77.685,59.5 78.257,58.928 v1(78.257,56.591)
  B.Cu w0.3: v1(15.494,41.834) 23.241,49.581 56.54,49.581 62.585,55.626 v1(67.615,55.626) 68.326,54.915 68.326,51.308 68.859,50.775 72.441,50.775 v1(78.257,56.591)
VREF_LATCH: C10.1 R5.2 U1.10 | length 7.5
  F.Cu w0.3: U1.10 55.15,58.73 56.38,57.5 R5.2 59.725,57.5 60.775,56.45 C10.1
pads on no net: J1.Un1 J1.Un2 J2.Un1 J2.Un2 J3.Un1 J3.Un2 J4.Un1 J4.Un2 J6.Un1 J6.Un2 J7.Un1 J7.Un2 K1.4

## Polygon pours and split planes (outlines as drawn)
GND on B.Cu "GND_L02_P000" (solid, remove dead copper, pour order 0): 0,70 90,70 90,0 0,0
GND on F.Cu "GND_L01_P001" (solid, remove dead copper, pour order 1): 0,70 90,70 90,0 0,0

## Keep-outs
Edge.Cuts:
  the board outline again, w0.1

## Silkscreen, mask and mechanical layers (free items; w line width, h text height)
F.SilkS:
  text "12V IN" at 6.65,62.65 h1
  text "BRK TH" at 1.15,40.65 h1
  text "TPS TH" at 18.65,38.65 h1
  text "ZFR BSPD Rev B 2026" at 31.65,38.15 h1
  text "SDC" at 75.65,1.15 h1
  text "BRK PWR" at 20.65,0.65 h1
  text "BRK SIG" at 33.65,0.65 h1
  text "TPS PWR" at 47.15,0.65 h1
  text "TPS SIG" at 60.15,0.65 h1